# Altium PCB PCB-Powermodule-v7.0.3.PcbDoc (part 3 of 3)
Units mil, origin at the board's own origin, x right, y up, seen from the top; angles counter-clockwise.
Board outline 3937.01 x 1771.65 mil, 2 copper layers (Top Layer, Bottom Layer), stack 61.811 mil thick; 138 components, 96 nets, 573 pads, 259 vias.
Unrouted connection lines stored in the file: 20.
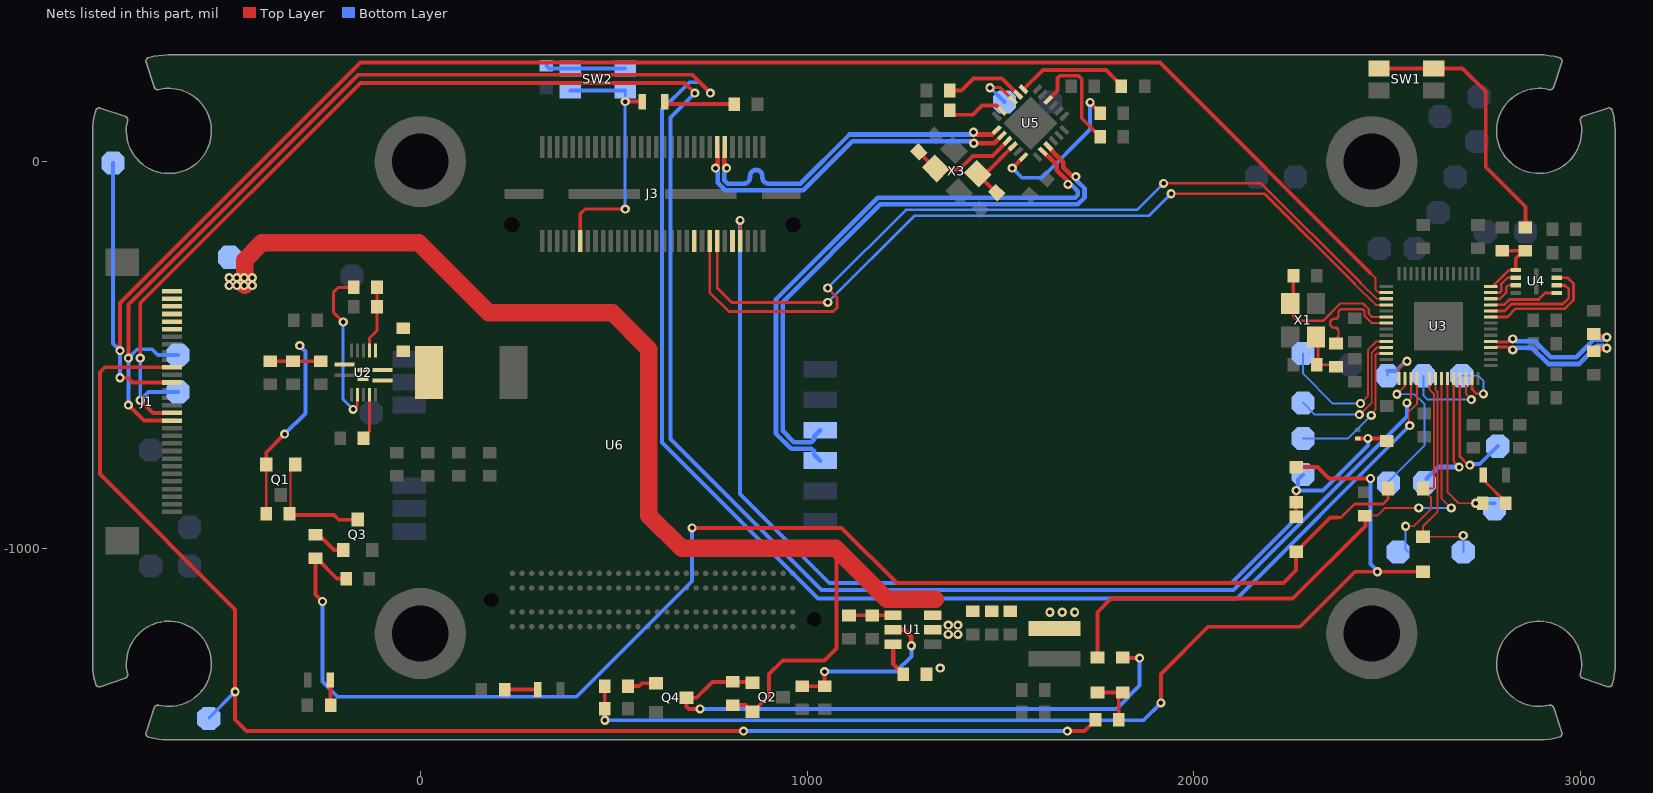
[diagram p2: the nets of this part, all layers, seen from the top]

## Via types
v1: diameter 23.62, hole 11.81, Top Layer to Bottom Layer, tented both sides, 257 vias
v2: diameter 23.62, hole 11.81, Top Layer to Bottom Layer, 2 vias

## Nets (pads, with @x,y where several pads share a name; then routed paths per layer and width w, separated by ;. In a path a pad name is that pad's centre, name@x,y a point inside that pad or via, vN(x,y) a via of type N, cw(c..) or ccw(c..) an arc to the next point about the centre after c; other vN are vias at no path point) (continued)
GPIO18: P37.1 U3.29 | length 127.9
  Top Layer w5: U3.29@2530.44,-560.96 2530.44,-534.56 2548.5,-516.5 v1(2551.46,-516.5)
  Bottom Layer w5: P37.1@2501,-554 P37.1@2501,-542
  Bottom Layer w10: P37.1@2501,-542 2522.27,-542 2547.77,-516.5 v1(2551.46,-516.5)
GPIO19: P38.1 U3.30 | length 370.1
  Top Layer w5: v1(2525.41,-601.79) 2546.19,-581.01 U3.30@2546.19,-560.96 U3.30@2545.33,-561.82
  Bottom Layer w5: P38.1@2503.8,-826.61 2596.8,-733.61 2596.8,-627.8 2570.79,-601.79 v1(2525.41,-601.79)
GPIO22: D6.2 P22.1 U3.34 | length 530.9
  Top Layer w5: v2(2547.8,-943.2) 2569.21,-943.2 2613.3,-899.11 2613.3,-867.8 2593.08,-847.58 D6.2@2593.08,-845.61 2617.87,-845.61 2620.8,-842.68 2620.8,-599.95 2609.18,-588.33 U3.34@2609.18,-560.96
  Bottom Layer w5: v2(2547.8,-943.2) 2547.8,-1002.8 P22.1@2555,-1010
GPIO23: D7.2 P21.1 U3.35 | length 575.1
  Top Layer w5: U3.35@2624.93,-560.96 2624.93,-589.93 2630.8,-595.8 2630.8,-905.2 2592.8,-943.2 D7.2@2592.8,-970.33 2692.67,-970.33 v2@2696,-967
  Bottom Layer w5: P21.1@2697,-1010 v2(2697,-967)
GPIO24: C18.2 D2.2 U3.36 | length 1506.3
  Top Layer w5: C18.2@2443.8,-915.61 2474.79,-915.61 2494.71,-895.69 v1(2581.8,-895.69) ; U3.36@2640.67,-560.96 2640.68,-591.54 2640.8,-591.66 2640.8,-871.8 v1@2666,-897
  Top Layer w10: D2.2@1751,-1282.68 1750.81,-1282.49 1750.81,-1165.61 1786.42,-1130 2256.01,-1130 2443.8,-942.21 C18.2@2443.8,-915.61
  Bottom Layer w5: v1(2581.8,-895.69) v1(2666,-895.69)
GPIO25: P39.1 R16.2 U3.37 | length 427.5
  Top Layer w5: U3.37@2656.42,-560.96 2656.42,-855.42 2684.61,-883.61 v1(2729,-883.61)
  Bottom Layer w10: v1(2729,-883.61) P39.1@2777.8,-883.61
GPIO26_ADC0: P16.1 U3.38 | length 330.2
  Top Layer w7: U3.38@2672.17,-560.96 2672.17,-776.17 v1(2686,-790)
  Bottom Layer w12: P16.1@2602.8,-819.61 2632.41,-790 v1(2686,-790)
GPIO27_ADC1: P17.1 U3.39 | length 329.6
  Top Layer w7: U3.39@2687.92,-560.96 2687.92,-763.2 2709.72,-785 v1(2714.18,-785)
  Bottom Layer w10: v1(2714.18,-785) 2716.79,-782.39 2739.61,-782.39 P17.1@2786,-736
GPIO28_ADC2: P18.1 U3.40 | length 239.1
  Top Layer w5: U3.40@2703.67,-560.96 2703.67,-601.02 2717.79,-615.14 v1(2717.79,-615.64)
  Bottom Layer w5: P18.1@2594,-554 2594,-604 2605.64,-615.64 v1(2717.79,-615.64)
GPIO29_ADC3: P19.1 U3.41 | length 157.5
  Top Layer w7: U3.41@2719.41,-560.96 2719.41,-588.55 2731.58,-600.71 2748.56,-600.71 v1(2748.84,-601)
  Bottom Layer w5: P19.1@2693,-554 2736,-554 2748.84,-566.84 v1(2748.84,-601)
HUB_RESET: P33.1 U5.15 | length 124.1
  Top Layer w8: v1(1473,191) 1500.11,191 U5.15@1532.01,159.1
  Bottom Layer w10: v1@1473.7,191 P33.1@1510.39,154.31
NetC1_1: C1.1 L1.1 U2.8 U2.9 U2.15 U2.16
NetC1_2: C1.2 U2.10
NetC2_2: C2.2 U2.6 | length 119.5
  Top Layer w7: C2.2@-147.2,-715.61 -147.2,-713.11 -135.7,-701.61 -135.56,-701.61 -131.45,-697.51 U2.6@-131.45,-602.68
NetC10_1: C10.1 L2.1 U1.2
  other v1: 1344.46,-1310.11 1364.98,-1222.61 1389.98,-1222.61 1364.98,-1198.61 1389.98,-1198.61 1628,-1165.61 1660,-1165.61 1692,-1165.61
NetC10_2: C10.2 U1.6 | length 88.4
  Top Layer w11.81: U1.6@1222.62,-1248.01 1222.62,-1299.43 C10.2@1248.8,-1325.61
NetC17_2: C17.2 R7.2 U2.11 | length 170.9
  Top Layer w7: U2.11@-131.44,-488.52 -131.44,-456.44
  Top Layer w8: -131.44,-456.44 -112.2,-437.2 C17.2@-112.2,-375.61 R7.2@-112.2,-325.61
NetC28_1: C28.1 R19.2 X1.3 | length 140.2
  Top Layer w7: X1.3@2321.26,-453.92 2321.26,-522.15 C28.1@2317.8,-525.61 2321.26,-525.61 R19.2@2352.8,-525.61 ; R19.2@2357.8,-530.61 R19.2@2352.8,-525.61 ; R19.2@2377.8,-525.61 R19.2@2352.8,-525.61
NetC34_2: C34.2 U5.22 X3.1 | length 168.1
  Top Layer w10: X3.1@1451.09,-42.47 C34.2@1489.01,-80.4 ; X3.1@1451.09,-41.57 1496,3.34 ; 1496,3.67 U5.22@1532.01,39.68
NetC35_1: C35.1 U5.21 X3.3 | length 264.3
  Top Layer w10: C35.1@1298.85,14.96 X3.3@1331.99,-18.18 ; X3.3@1332.51,-17.65 1335.3,-20.43 1393.62,-20.43 1428.67,14.62 1479.11,14.62 U5.21@1518.09,53.6
NetC38_2: C38.2 U5.10 | length 307.3
  Top Layer w10: U5.10@1622.54,158.05 U5.10@1623.59,159.1 1647.54,183.05 1647.54,216.03 1653.39,221.89 1701.94,221.89 1710.19,213.64 1710.19,112 1745.3,76.89 1747.8,76.89 1757.8,66.89 C38.2@1757.8,64.39
NetD2_1: D2.1 D3.1 R29.2 | length 144.3
  Top Layer w10: D2.1@1751,-1373.23 1807.09,-1373.23 1807.93,-1374.07 1817.99,-1373.23 D3.1@1816,-1373.23 1806,-1383.23 R29.2@1806,-1444
NetD3_2: D3.2 Q2.1 Q4.3 R11.1 | length 1527.4
  Top Layer w10: v1(723.33,-1415.41) 722.74,-1416 694.03,-1416 688.17,-1410.14 Q4.3@688.17,-1386.61 714.39,-1386.61 755.39,-1345.61 R11.1@807.8,-1345.61 ; R11.1@808.19,-1346 857.22,-1346 Q2.1@859.43,-1348.21 ; D3.2@1816,-1282.68 1817.32,-1284 v1(1860,-1284)
  Bottom Layer w10: v1(723.33,-1415.41) 1799.7,-1415.41 1860,-1355.12 v1(1860,-1284)
NetD4_1: D4.1 D6.1 R12.1 R14.1 | length 3666.7
  Top Layer w7: 2370.77,-920.61 2380.77,-920.61 2415.77,-885.61 2489.39,-885.61 2502.52,-872.48 D6.1@2502.52,-845.61
  Top Layer w10: v1(-253.09,-1137.78) -271.2,-1119.67 R12.1@-271.2,-1025.61 -268.7,-1025.61 -216.34,-1077.97 -192.84,-1077.97 R14.1@-192.2,-1078.61 ; v1(702.7,-947.24) 1089.5,-947.24 1232.26,-1090 2231.59,-1090 2264.8,-1056.79 D4.1@2264.8,-1008.89 2266.77,-1008.89 2277.52,-998.14 2277.52,-996.17 2353.08,-920.61 2370.77,-920.61
  Bottom Layer w10: v1(-253.09,-1137.78) -253.09,-1344.91 -214,-1384 404,-1384 702.7,-1085.3 v1(702.7,-947.24)
NetD5_1: D5.1 D7.1 R13.1 R15.1 | length 2866.8
  Top Layer w10: v1@476.8,-1444.78 R15.1@476.8,-1415.06 ; R13.1@476.8,-1356.61 R15.1@476.8,-1414.61 R15.1@477.25,-1415.06 ; v1(1915,-1400) 1915,-1325 2037,-1203 2274.52,-1203 2416.63,-1060.89 D7.1@2592.8,-1060.89 ; D5.1@2257.8,-790.33 2320.33,-790.33 2349.61,-819.61 v1(2456.99,-819.61)
  Bottom Layer w10: v1(477.25,-1444.78) 1870.22,-1444.78 v1(1915,-1400) ; v1(2456.99,-819.61) 2456.99,-1040.77 2474.79,-1058.58 v1(2474.79,-1060.89)
NetJ3_49: J3.49 LED4.2 SW2.1 | length 683.9
  Top Layer w5: LED4.2@572.66,155 LED4.2@573.27,154.39
  Top Layer w8: J3.49@413.39,-205.36 413.4,-135.36 425.65,-123.11 v1(529.67,-123.11)
  Top Layer w10: v1(529.67,155) LED4.2@572.66,155
  Bottom Layer w6: v1(529.67,155) SW2.1@529.67,183.86
  Bottom Layer w8: v1(529.67,-123.11) v1(529.67,155)
  Bottom Layer w10: SW2.1@387.93,183.86 SW2.1@529.67,183.86
NetLED1_1: LED1.1 R1.1 | length 85.5
  Top Layer w10: R1.1@217.8,-1365.61 LED1.1@303.27,-1365.61
NetLED2_1: LED2.1 R4.1 | length 65.2
  Top Layer w10: LED2.1@-232.67,-1340.61 -232.67,-1405.14 R4.1@-232.2,-1405.61
NetLED3_1: LED3.1 R16.1 | length 97.2
  Top Layer w7: LED3.1@2748.27,-810.61 2754.61,-816.95 2754.61,-828.92 2806.8,-881.11 R16.1@2806.8,-883.61
NetLED4_1: LED4.1 R23.1 | length 182.7
  Top Layer w10: LED4.1@632.33,154.39 632.33,153.23 637.17,148.39 R23.1@811.81,148.39
NetQ1_1: Q1.1 Q3.3 R9.1 | length 316.6
  Top Layer w6: R9.1@-338.6,-911 -336.02,-908.42 -336.02,-795.46 Q1.1@-323.8,-783.24
  Top Layer w10: R9.1@-338.6,-911 -335.17,-914.43 -222.88,-914.43 -211.07,-926.24 Q3.3@-162.2,-926.24
NetQ3_1: Q3.1 R12.2 | length 78.6
  Top Layer w10: R12.2@-262.2,-966.24 -223.46,-1004.98 Q3.1@-199.6,-1004.98
NetQ4_1: Q4.1 R13.2 | length 75.7
  Top Layer w10: R13.2@536.8,-1356.61 565.99,-1356.61 573.39,-1349.21 Q4.1@609.43,-1349.21
NetR3_1: R3.1 R6.1 U1.4 | length 114.5
  Top Layer w10: R3.1@1108.39,-1173.8 1108.98,-1173.21 U1.4@1222.62,-1173.21
NetR5_2: R5.2 R8.2 U1.5 | length 442.8
  Top Layer w10: R5.2@987.8,-1356.61 988.19,-1357 1045.8,-1357 1045,-1356.2 v1(1045,-1319)
  Top Layer w11.81: U1.5@1222.62,-1210.61 1251.3,-1210.61 1269.66,-1228.97 v1(1269.66,-1252.04)
  Bottom Layer w10: v1(1045,-1319) 1230.41,-1319 1269.66,-1279.74 v1(1269.66,-1252.04)
NetR7_1: R7.1 U2.4 | length 425
  Top Layer w7: v1(-173.81,-641) -172.42,-641 -162.95,-631.54 U2.4@-162.95,-602.68
  Top Layer w8: v1(-199.61,-415) -225.06,-389.55 -225.06,-338.25 -212.42,-325.61 R7.1@-172.2,-325.61
  Bottom Layer w8: v1@-199.61,-415.67 -199.61,-615.2 v1(-173.81,-641)
NetR22_1: R22.1 SW1.2 | length 695.1
  Top Layer w10: SW1.2@2478.93,240.94 SW1.2@2620.67,240.94 2695.06,240.94 2755,181 2755,-14 2857.8,-116.8 R22.1@2857.8,-170.61
NetR24_1: R24.1 SW2.2 | length 206.6
  Bottom Layer w10: R24.1@326,248 333.06,240.94 SW2.2@387.93,240.94 SW2.2@529.67,240.94
NetR25_1: R25.1 U5.24 | length 413.5
  Top Layer w10: v1(1530.75,-17.01) 1530.87,-17.01 1559.72,11.84 U5.24@1559.84,11.84 ; v1@1732,152.69 1757.8,126.89 R25.1@1757.8,124.39
  Bottom Layer w10: v1(1530.75,-17.01) 1555.51,-41.77 1607.64,-41.77 1732,82.59 v1(1732,153)
NetR26_2: R26.2 U5.13 | length 292.7
  Top Layer w10: U5.13@1559.84,186.94 1609.79,236.89 1772.8,236.89 1780.36,229.33 1812.8,196.89 R26.2@1812.8,194.39
NetR27_2: R27.2 U5.14 | length 207.5
  Top Layer w10: R27.2@1368.88,183.74 1398.91,183.74 1430.29,215.11 1503.84,215.11 U5.14@1545.92,173.02
NetR28_2: R28.2 U5.17 | length 158.5
  Top Layer w10: R28.2@1368.78,132.43 1368.78,130.88 1378.78,120.88 1427.6,120.88 1452.05,145.33 1489.37,145.33 1504.51,130.2 U5.17@1505.23,130.2
QSPI_SD0: U3.53 U4.5 | length 183.6
  Top Layer w7: U3.53@2768.15,-370.49 2802.18,-370.49 2816.15,-356.52 2891.83,-356.52 2908.21,-340.15 U4.5@2939.21,-340.15
QSPI_SD1: U3.55 U4.2 | length 91.4
  Top Layer w6: U3.55@2768.15,-339 2790.99,-339 2795.52,-334.47 2795.52,-316.26 2811.15,-300.63 U4.2@2832.94,-300.63
QSPI_SD2: U3.54 U4.3 | length 87.2
  Top Layer w6: U3.54@2768.15,-354.74 2792.03,-354.75 2807.72,-339.06 2807.72,-325.27 2812.53,-320.47 U4.3@2833.09,-320.47
QSPI_SD3: U3.51 U4.7 | length 323.4
  Top Layer w7: U3.51@2768.15,-401.99 2811.01,-401.99 2832.48,-380.52 2957.48,-380.52 2959.45,-380.52 2982,-357.97 2982,-356 2982,-318 2982,-315.49 2967.13,-300.62 U4.7@2939.36,-300.62
QSPI_SLCK: U3.52 U4.6 | length 273.4
  Top Layer w7: U3.52@2768.15,-386.24 2803.4,-386.24 2821.12,-368.52 2954.48,-368.52 2970,-353 2970,-330 2960.46,-320.46 U4.6@2939.21,-320.46
QSPI_SS: R21.1 R22.2 U3.56 U4.1 | length 194.6
  Top Layer w6: U3.56@2768.15,-323.25 2772.53,-323.25 2815.15,-280.63 U4.1@2832.62,-280.63
  Top Layer w10: R21.1@2797.8,-230.61 R22.2@2852.39,-230.61 ; U4.1@2832.62,-280.63 2832.62,-250.69 R22.2@2852.39,-230.92
RESET_MCU: J3.09
RESET_USB_HUB: J3.19
RUN: P26.1 U3.26 | length 391
  Top Layer w5: v1(2458.8,-656.39) 2458.8,-652.11 2470.31,-640.6 2470.31,-499.4 2473.24,-496.47 U3.26@2497.45,-496.48
  Bottom Layer w5: P26.1@2282.8,-716.54 2398.66,-716.54 v1(2458.8,-656.39)
SBUS_TX: J1.13 P29.1 U3.16 | length 4616
  Top Layer w5: 2456.5,-287.81 2469.45,-300.76 2469.45,-330.61 2477.83,-339 U3.16@2497.45,-339
  Top Layer w10: v1(-776.81,-559.08) -756.51,-559.08 -744.19,-571.4 J1.13@-648.22,-571.4 ; v1(-776.81,-488.75) -776.81,-365.52 -154.89,256.41 1912.28,256.41 2456.5,-287.81
  Bottom Layer w10: P29.1@-795.2,-3.61 -795.2,-470.36 v1(-776.81,-488.75) v1(-776.81,-559.08)
SCL0: J1.18 P28.1 U3.32 | length 5750.8
  Top Layer w5: v1(2558.66,-682.75) 2555.91,-680 2555.91,-647.49 2577.68,-625.71 U3.32@2577.68,-560.96
  Top Layer w10: v1(-755,-630) -715.18,-669.82 J1.18@-642.52,-669.8 ; v1(-755,-508.13) -755,-370.02 -160.35,224.64 702.36,224.64 v1(750,177)
  Bottom Layer w10: v1(-755,-630) v1(-755,-508.13) ; v1@-755,-505.85 v1(-755,-508.13) ; P28.1@-627.2,-500.61 -679.22,-500.61 -694.52,-485.32 -732.19,-485.32 v1(-755,-508.13) ; v1(750,177) 721.81,205.19 695.66,205.19 624.99,134.52 624.99,-726.38 1028.61,-1130 2111.42,-1130 2538.92,-702.49 v1(2558.66,-682.75)
SCL_VOXL: J3.13 U3.18 | length 2102.2
  Top Layer w5: 2416.54,-316.99 2470.05,-370.5 U3.18@2497.45,-370.49
  Top Layer w7: J3.13@767.72,-205.36 767.72,-326.82 805.22,-364.31 v1(1053.35,-364.31) ; v1(1941.4,-83.21) 2182.76,-83.21 2416.54,-316.99
  Bottom Layer w7: v1(1053.35,-364.31) 1277.52,-140.15 1884.46,-140.15 v1(1941.4,-83.21)
SDA0: J1.17 P27.1 U3.31 | length 5409.3
  Top Layer w5: v1(2551,-624) 2551,-622.73 2561.95,-611.78 U3.31@2561.93,-560.96
  Top Layer w10: v1(-724.3,-617.13) -691.29,-650.14 J1.17@-642.52,-650.12 ; v1(-724.3,-508.27) -724.3,-366.27 -154.42,203.6 683.45,203.6 v1(710.06,177)
  Bottom Layer w10: v1(-724.3,-508.27) v1(-724.3,-617.13) -702.78,-595.61 P27.1@-627.2,-595.61 ; v1(710.06,177) 646.8,113.74 646.8,-717.35 1037.64,-1108.19 2102.38,-1108.19 2551,-659.57 v1(2551,-624)
SDA_VOXL: J3.15 U3.17 | length 2227.8
  Top Layer w5: 2432.09,-314.11 2472.72,-354.74 U3.17@2497.45,-354.74
  Top Layer w7: J3.15@748.04,-205.36 748.04,-338.27 797.71,-387.94 1067.47,-387.94 1077.39,-378.02 1077.39,-351.04 v1(1053.35,-327) ; v1(1922.04,-56.32) 2174.3,-56.32 2432.09,-314.11
  Bottom Layer w7: v1(1053.35,-327) 1255.35,-125 1853.36,-125 v1(1922.04,-56.32)
SW1: J1.11 P3.1 R29.1 | length 3574.7
  Top Layer w10: J1.11@-648.22,-532.03 -816.03,-532.03 -829,-545 -829,-808 -479,-1158 v1(-479,-1371.2) -479,-1443.22 -449.41,-1472.81 v1(835.52,-1472.81) ; v1(1673,-1472.81) 1717.19,-1472.81 1733.5,-1456.5 1736,-1456.5 1746,-1446.5 R29.1@1746,-1444
  Bottom Layer w10: P3.1@-546,-1438.2 v1(-479,-1371.2) ; v1(835.52,-1472.81) v1(1673,-1472.81)
SWCLK: P24.1 U3.24 | length 435
  Top Layer w5: v1(2431.12,-625.71) 2450.31,-606.52 2450.31,-487.22 2472.56,-464.97 U3.24@2497.45,-464.98
  Bottom Layer w5: P24.1@2282.8,-496.61 2282.8,-548.5 2360.01,-625.71 v1(2431.12,-625.71)
SWDIO: P25.1 U3.25 | length 375.2
  Top Layer w5: v1(2428.37,-654.58) 2429.56,-654.58 2460.31,-623.83 2460.31,-494.23 2473.83,-480.72 U3.25@2497.45,-480.73
  Bottom Layer w5: P25.1@2282.8,-624.07 2313.31,-654.58 v1(2428.37,-654.58)
USB-WIFI_N: U5.2 U6.3 | length 1543.4
  Top Layer w12: U5.2@1609.68,25.76 1610.37,25.76 1623.82,12.3 1625.03,12.3 1645.93,-8.6 1645.93,-22.08 1674.75,-50.89 v1(1674.75,-59.11)
  Bottom Layer w12: U6.3@1033.84,-773.37 1018.19,-757.72 1018.19,-749.53 1011.16,-742.5 958.67,-742.5 919.63,-703.45 919.63,-356.29 1182.42,-93.5 1693.35,-93.5 1700.38,-86.47 1700.38,-76.53 1685.19,-61.34 1676.97,-61.34 v1(1674.75,-59.11)
USB-WIFI_P: U5.3 U6.4 | length 1529.3
  Top Layer w12: U5.3@1623.59,39.68 1623.59,38.99 1637.05,25.53 1637.05,24.32 1662.93,-1.56 1662.93,-15.04 1686.77,-38.87 v1(1694.99,-38.87)
  Bottom Layer w12: U6.4@1033.84,-694.63 1018.19,-710.28 1018.19,-718.47 1011.16,-725.5 965.72,-725.5 936.63,-696.41 936.63,-363.34 1189.46,-110.5 1700.39,-110.5 1717.38,-93.51 1717.38,-69.49 1697.21,-49.32 1697.21,-41.1 v1(1694.99,-38.87)
USB_D_N: R18.1 U3.46 | length 383
  Top Layer w8: U3.46@2768.15,-480.73 2781.32,-480.73 2782.69,-479.35 2812.96,-479.35 2820.77,-487.17 v1(2825,-487.17)
  Top Layer w12: R18.1@3034,-491 3039.97,-485.03 3065.78,-485.03 v1(3068,-482.81)
  Bottom Layer w12: v1(2825,-487.17) 2828.14,-487.17 2833.96,-481.35 2874.31,-481.35 2916.39,-523.43 2996.49,-523.43 3023.22,-496.71 3023.22,-495.83 3042.04,-477 3059.04,-477 3064.86,-482.81 v1(3068,-482.81)
USB_D_P: R20.1 U3.47 | length 383
  Top Layer w8: U3.47@2768.15,-464.98 2781.32,-464.98 2782.69,-466.35 2812.96,-466.35 2820.77,-458.54 v1(2825,-458.54)
  Top Layer w12: R20.1@3034,-446 3039.97,-451.97 3065.78,-451.97 v1(3068,-454.19)
  Bottom Layer w12: v1(2825,-458.54) 2828.14,-458.54 2833.96,-464.35 2881.35,-464.35 2923.43,-506.43 2989.45,-506.43 3006.22,-489.67 3006.22,-488.79 3035,-460 3059.04,-460 3064.86,-454.19 v1(3068,-454.19)
VBAT: C3.2 C4.2 C5.2 C6.2 C7.2 C8.2 J1.1 J1.2 J1.3 J1.4 J1.5 J1.6 P6.1 Q1.2 Q2.2 R9.2 R11.2 U1.3 U2.1 | length 3759.4
  Top Layer w6: R9.2@-398.6,-911 Q1.2@-398.6,-783.24
  Top Layer w10: Q1.2@-398.6,-780.64 -398.6,-752.6 v1(-351,-705) ; C6.2@-388,-516.4 -387.95,-516.45 C8.2@-257.76,-516.45 ; R11.2@807.8,-1405.61 840.46,-1405.61 846.32,-1411.47 846.32,-1411.87 857.46,-1423.01 Q2.2@859.43,-1423.01 901.43,-1381.01 901.43,-1325.57 937,-1290 1045,-1290 1076,-1259 1076,-1183.05 1075.89,-1182.94 1075.89,-1084.66 1076,-1084.55 1076,-991.54
  Top Layer w45: v1@-454.68,-320.49 -454.68,-254.67 -410.13,-210.13 -4.12,-210.13 176.57,-390.83 496.83,-390.83 591,-485 591,-915.56 675.44,-1000 1074,-1000 1206,-1132 1332.14,-1132
  Bottom Layer w10: v1(-351,-705) -297.1,-651.1 -297.1,-491 v1(-311.94,-476.16)
  other v1: -494.68,-320.49 -474.68,-320.49 -455.68,-320.49 -434.68,-320.49 -494.68,-300.49 -474.68,-300.49 -455.68,-300.49 -434.68,-300.49
VOXL_EN_BUCK: D1.1 D4.2 D5.2 J3.07 P20.1 R10.2 | length 2873.6
  Top Layer w7: v1(826.85,-152.11) v1(826.85,-152.11) J3.07@826.89,-205.36
  Top Layer w10: D4.2@2264.8,-918.33 D5.2@2264.8,-880.89 2264.85,-880.83 v1@2264.85,-850.71 ; R10.2@2423.84,-715.89 v1(2450.31,-715.89) D1.1@2492.8,-715.89
  Bottom Layer w10: v1(826.85,-152.11) 826.85,-859.53 1057.32,-1090 2097.96,-1090 2264.85,-923.11 v1(2264.85,-850.61) ; P20.1@2282.8,-809 2269.87,-821.93 2269.87,-841.9 2264.85,-846.92 v1(2264.85,-850.61) ; v1(2450.31,-715.89) 2450.31,-734.47 2334.17,-850.61 v1(2264.85,-850.61)
VOXL_USB_N: J3.12 U5.19 | length 892.8
  Top Layer w12: v1@786.07,-8.04 786.07,13.75 787.41,15.1 J3.12@787.41,37.64 ; v1(1430.44,75.8) 1433.59,75.8 1439.39,69.99 1478.81,69.99 U5.19@1490.25,81.43
  Bottom Layer w12: v1(791.88,-17) 791.88,-20.14 786.07,-25.96 786.07,-48 795.07,-57 804.1,-57 836.37,-57 ccw(c836.37,-41) 852.37,-41 852.37,-37.71 cw(c868.37,-37.71) 884.37,-37.71 884.37,-41 ccw(c900.37,-41) 900.37,-57 938.37,-57 982.83,-57 1109.77,69.95 1421.45,69.95 1427.3,75.8 v1(1430.44,75.8)
VOXL_USB_P: J3.14 U5.20 | length 885.4
  Top Layer w12: J3.14@767.72,37.64 767.72,15.1 769.07,13.75 v1@769.07,-8.04 ; v1(1431.05,47.18) 1483.84,47.18 U5.20@1498.8,62.15
  Bottom Layer w12: v1(763.25,-17) 763.25,-20.14 769.07,-25.96 769.07,-55.04 788.02,-74 938.37,-74 989.87,-74 1116.81,52.95 1422.15,52.95 1427.91,47.18 v1(1431.05,47.18)
XIN: C27.1 U3.20 X1.1 | length 417.8
  Top Layer w6: X1.1@2254.34,-372.51 2257.35,-375.52 2257.35,-400.35 2268.99,-411.99 2334.08,-411.99 2378.76,-367.3 2437.86,-367.3 2452.3,-381.74 2452.3,-393.49 2460.8,-401.99 U3.20@2497.45,-401.99
  Top Layer w7: X1.1@2256.45,-347.62 C27.1@2256.45,-295.62 ; X1.1@2257.8,-347.61 C27.1@2257.8,-295.61
XOUT: R19.1 U3.21 | length 267.9
  Top Layer w6: R19.1@2354.45,-472.62 2374.45,-452.62 2374.45,-438.73 ccw(c2365.2,-438.73) 2365.2,-429.48 2362.47,-429.48 cw(c2362.47,-420.23) 2353.22,-420.23 2353.22,-416.12 cw(c2362.47,-416.12) 2362.47,-406.87 2365.2,-406.87 ccw(c2365.2,-397.62) 2374.45,-397.62 2374.45,-387.17 2380.01,-381.61 2428.47,-381.61 2436.61,-381.61 2441.3,-386.3 2441.3,-394.44 2441.3,-398.87 2460.17,-417.74 U3.21@2497.45,-417.74
pads on no net: J1.8 J1.9 J1.MP1 J1.MP2 J2. J2.A05 J2.A06 J2.A08 J2.A09 J2.A10 J2.A11 J2.A12 J2.A14 J2.A16 J2.A17 J2.A18 J2.A19 J2.A20 J2.A21 J2.A23 J2.A25 J2.A26 J2.A28 J2.A29 J2.B07 J2.B08 J2.B09 J2.B10 J2.B11 J2.B12 J2.B13 J2.B14 J2.B16 J2.B17 J2.B18 J2.B19 J2.B20 J2.B21 J2.B23 J2.B24 J2.B25 J2.B26 J2.B28 J2.B29 J2.C05 J2.C06 J2.C07 J2.C08 J2.C09 J2.C10 J2.C12 J2.C13 J2.C14 J2.C15 J2.C16 J2.C18 J2.C19 J2.C20 J2.C21 J2.C22 J2.C24 J2.C28 J2.C29 J2.C30 J2.D05 J2.D06 J2.D07 J2.D08 J2.D09 J2.D10 J2.D11 J2.D13 J2.D14 J2.D16 J2.D17 J2.D19 J2.D20 J2.D22 J2.D23 J2.D25 J2.D26 J2.D29 J2.D30 J3. J3.02 J3.03 J3.04 J3.05 J3.06 J3.08 J3.16 J3.20 J3.22 J3.23 J3.24 J3.25 J3.26 J3.27 J3.28 J3.29 J3.30 J3.32 J3.33 J3.34 J3.35 J3.37 J3.38 J3.39 J3.40 J3.41 J3.42 J3.43 J3.45 J3.46 J3.47 J3.48 J3.50 J3.51 J3.52 J3.53 J3.54 J3.55 J3.56 J3.57 J3.60 U5.6 U5.7 U5.8 U5.11 U5.12 U5.23 U6.1 U6.6 U6.8 U6.11

## Polygon pours and split planes (outlines as drawn)
VBAT on Top Layer "Polygon_3_Net_+12V" (solid, remove dead copper, pour order 34): -405.5,-466 -405.5,-538.79 -168.29,-538.79 -168.29,-512.79 -180.05,-512.79 -183.29,-509.54 -183.29,-466
VBAT on Top Layer "VBAT_L01_P048" (solid, pour order 48): -373,-444.74 -351.74,-466 -329.19,-466 -329.19,-531.15 -336.83,-538.79 -454.68,-538.79 -454.68,-427.68 -585,-427.68 -596.81,-439.49 -668.11,-439.49 -668.11,-329.25 -622.14,-329.25 -474.89,-182 -373,-182
+5V on Top Layer "+5V_L01_P047" (solid, pour order 47): -614.91,-821.38 -603.09,-833.19 -516,-833.19 -516,-975.52 -612.48,-975.52 -668.11,-919.89 -668.11,-821.38
+5V on Top Layer "Polygon_3_Net_+5V" (solid, remove dead copper, pour order 46): 181.12,-776 271.12,-776 297.8,-802.68 297.8,-838.54 132.8,-1003.54 132.8,-1257.68 165.73,-1290.61 269.87,-1290.61 282.8,-1277.68 282.8,-1047.68 330.5,-999.98 427.8,-967.54 427.8,-708.54 384.87,-665.61 195.73,-665.61 172.8,-688.54 172.8,-767.68
GND on Top Layer "Polygon_1_Net_GND" (solid, remove dead copper, pour order 30): 2918.15,-372.62 2918.15,-673 3082.79,-673 3082.79,-372.62
+1V1 on Top Layer "Polygon_1_Net_+1V1" (solid, remove dead copper, pour order 28): 2898.65,-532 2851.09,-532 2807.19,-488.1 2763.65,-488.1 2763.65,-503.1 2795.12,-503.1 2838.65,-546.63 2838.65,-563.1 2858.65,-583.1 2898.65,-583.1
+5V on Top Layer "Polygon_3_Net_+5V" (solid, remove dead copper, pour order 24): 127,-999.98 127,-1290.61 282.8,-1290.61 282.8,-1047.68 282.8,-999.98
+1V1 on Top Layer "Polygon_3_Net_+1V1" (solid, remove dead copper, pour order 21): 2748.65,-463.11 2748.65,-498.11 2703.65,-498.11 2703.65,-361.64 2700.12,-358.11 2572.19,-358.11 2568.65,-361.64 2568.65,-463.11 2538.65,-463.11 2538.65,-438.11 2548.65,-438.11 2548.65,-354.57 2565.12,-338.11 2707.19,-338.11 2723.65,-354.57 2723.65,-463.11
+3V3 on Top Layer "Polygon_2_Net_+3V3" (solid, remove dead copper, pour order 20): 2898.65,-629.44 2898.65,-628.09 2898.65,-590 2860.56,-590 2778.65,-508.09 2693.65,-508.09 2693.65,-493.09 2563.65,-493.09 2563.65,-468.09 2533.65,-468.09 2533.65,-433.09 2543.65,-433.09 2543.65,-341.63 2552.19,-333.09 2710.12,-333.09 2728.65,-351.63 2728.65,-458.09 2768.65,-458.09 2768.65,-298.09 2508.65,-298.09 2508.65,-553.09 2730,-553.09 2730,-629.44
NetC1_1 on Top Layer "Polygon_1_Net_N$2" (solid, remove dead copper, pour order 12): -162,-518.65 -96.7,-518.65 -87.73,-509.68 -83.75,-505.7 -83.75,-480.7 -66.7,-463.65 -50.25,-463.65 121.19,-463.65 133.25,-475.7 133.25,-618.6 121.19,-630.65 -66.7,-630.65 -78.75,-618.6 -78.75,-598.6 -92.73,-584.63 -96.7,-580.65 -162,-580.65
GND on Top Layer "Polygon_4_Net_GND" (solid, remove dead copper, pour order 9): 273,-1250.61 1057.8,-1250.61 1057.8,-1039 273,-1039
+3V3 on Top Layer "Polygon_3_Net_+3V3" (solid, remove dead copper, pour order 5): 1709,-1256.98 1571.3,-1256.98 1571.3,-1303.8 1591.3,-1323.8 1591.3,-1488.5 1689,-1488.5 1689,-1323.5 1709,-1303.5
GND on Top Layer "Polygon_8_Net_GND" (solid, remove dead copper, pour order 45): 2049.3,-1495.6 2049.3,-1102.11 2791.35,-1102.11 2999.3,-894.16 2999.3,-592.11 3089.81,-592.11 3089.81,-1495.6
NetC10_1 on Top Layer "Polygon_4_Net_N$8" (solid, remove dead copper, pour order 0): 1373,-1351 1373,-1305 1367,-1299 1292,-1299 1292,-1357 1367,-1357
NetC10_1 on Top Layer "Polygon_1_Net_N$8" (solid, remove dead copper, pour order 1): 1402,-1238.11 1360.95,-1238.11 1350.95,-1228.11 1302,-1228.11 1302,-1193.11 1350.95,-1193.11 1360.95,-1183.11 1402,-1183.11
NetC10_1 on Top Layer "Polygon_5_Net_N$8" (solid, remove dead copper, pour order 3): 1566,-1130.15 1566,-1229.76 1709,-1229.76 1709,-1128 1698.76,-1117.76 1578.39,-1117.76
VBAT on Top Layer "Polygon_1_Net_+12V" (solid, remove dead copper, pour order 6): 1551,-1109.5 1303,-1109.5 1303,-1183.5 1341.62,-1183.5 1351.92,-1173.21 1405.71,-1173.21 1416,-1183.5 1551,-1183.5
VBAT on Top Layer "Polygon_1_Net_+12V" (solid, remove dead copper, pour order 7): 1556,-1307 1580,-1331 1580,-1455 1415,-1455 1415,-1277 1301,-1277 1301,-1233.11 1347.02,-1233.11 1357.02,-1243.11 1401.11,-1243.11 1436.22,-1208 1556,-1208
+5V on Top Layer "Polygon_1_Net_+5V" (solid, remove dead copper, pour order 11): 199,-775.57 199,-698 278,-698 278,-476 200,-476 200,-644.57 -85.96,-644.57 -109.2,-621.33 -109.2,-584.57 -120.2,-584.57 -120.2,-775.57
NetC1_2 on Top Layer "Polygon_1_Net_N$19" (solid, remove dead copper, pour order 14): -119.69,-460.08 -119.69,-507 -99.2,-507 -99.2,-454.89 -90.96,-446.64 -19.2,-446.64 -19.2,-397.4 -25.96,-390.64 -73.44,-390.64 -80.2,-397.4 -80.2,-412.6
+3V3 on Top Layer "Polygon_5_Net_+3V3" (solid, remove dead copper, pour order 39): -679.21,-721.61 -679.21,-705 -742,-705 -742,-787 -681,-787 -681,-775 -616.93,-775 -616.93,-721.61
+1V1 on Top Layer "Polygon_2_Net_+1V1" (solid, remove dead copper, pour order 27): 2892.96,-393 2892.96,-440 2831.73,-440 2809.23,-417.5 2833.73,-393
GND on Top Layer "GND_L01_P037" (solid, pour order 37): -827.53,-1357.78 cw(c-830.64,-1348.44) -840.13,-1351.05 cw(c-650.38,-1298.77) -847.2,-1298.76 -847.2,79.19 cw(c-650.34,79.21) -840.13,131.49 cw(c-830.64,128.87) -827.53,138.21 -763.66,116.94 cw(c-766.78,107.61) -757.22,105.27 ccw(c-650.35,79.19) -549.41,35.46 -545.98,44.43 ccw(c-650.34,79.19) -676.42,186.06 cw(c-678.76,195.63) -688.1,192.51 -709.37,256.37 cw(c-700.03,259.48) -702.64,268.97 cw(c-650.33,79.2) -652.14,276.04 2892.96,276.04 cw(c2892.96,79.21) 2945.67,268.85 cw(c2942.63,259.48) 2951.96,256.32 2930.7,192.49 cw(c2921.37,195.61) 2919.28,186 2918.49,186.19 ccw(c2892.95,79.19) 2858.19,-25.17 2867.42,-27.8 ccw(c2892.96,79.19) 2999.82,105.29 cw(c3009.38,107.6) 3006.27,116.94 3070.13,138.21 cw(c3073.25,128.87) 3082.79,131.29 cw(c2892.94,79.2) 3089.06,96.32 3089.81,79.19 3089.81,-1298.76 cw(c2892.96,-1298.74) 3082.5,-1351.89 3082.47,-1351.88 cw(c3073.24,-1348.44) 3070.13,-1357.78 3006.27,-1336.51 cw(c3009.39,-1327.17) 2999.82,-1324.83 ccw(c2892.96,-1298.75) 2792.02,-1255.03 2788.59,-1263.99 ccw(c2892.96,-1298.76) 2919.03,-1405.63 cw(c2921.37,-1415.19) 2930.71,-1412.07 2951.98,-1475.94 cw(c2942.64,-1479.05) 2946.82,-1487.96 2946.88,-1488.08 cw(c2892.95,-1298.76) 2892.96,-1495.61 -650.35,-1495.61 -652.14,-1495.6 cw(c-650.37,-1298.76) -702.64,-1488.54 cw(c-700.03,-1479.05) -709.37,-1475.94 -688.1,-1412.07 cw(c-678.76,-1415.19) -676.42,-1405.63 ccw(c-650.35,-1298.76) -545.98,-1263.99 -549.41,-1255.03 ccw(c-650.35,-1298.75) -757.22,-1324.83 cw(c-766.78,-1327.17) -763.66,-1336.51
GND on Top Layer "Polygon_5_Net_GND" (solid, remove dead copper, pour order 31): 197.87,113.89 197.87,-296.11 1007.87,-296.11 1007.87,113.89
GND on Top Layer "Polygon_17_Net_GND" (solid, remove dead copper, pour order 8): 1228.82,256.32 1228.82,52.64 1327.06,-45.6 1427.06,-145.6 1929.96,-145.6 1982.01,-93.55 1982.01,11.4 1832.8,11.4 1832.8,102.82 1832.8,256.32
+5V on Bottom Layer "+5V_L02_P025" (solid, pour order 25): 105,-677 168,-677 168,-993 266,-993 270,-993 270,-1005 270,-1275 137,-1275 105,-1275
NetC10_1 on Bottom Layer "Polygon_3_Net_N$8" (solid, remove dead copper, pour order 2): 1400.48,-1227.11 1400.48,-1342.06 1383.43,-1359.11 1345.53,-1359.11 1333.48,-1347.06 1333.48,-1304.16 1345.53,-1292.11 1365.53,-1292.11 1373.48,-1284.16 1373.48,-1227.11
NetC10_1 on Bottom Layer "Polygon_2_Net_N$8" (solid, remove dead copper, pour order 4): 1399.48,-1238.11 1354.48,-1238.11 1354.48,-1183.11 1398.02,-1183.11 1408.02,-1193.11 1525.95,-1193.11 1539.48,-1179.57 1539.48,-1144.57 1709,-1144.57 1709,-1198.11 1578.02,-1198.11 1553.02,-1223.11 1408.02,-1223.11 1399.48,-1231.65
+3V3 on Bottom Layer "Polygon_3_Net_+3V3" (solid, remove dead copper, pour order 42): 1572.3,-1282.18 1710,-1282.18 1710,-1329 1690,-1349 1690,-1395 1592.3,-1395 1592.3,-1348.7 1572.3,-1328.7
VBAT on Bottom Layer "Polygon_2_Net_+12V" (solid, remove dead copper, pour order 15): -523.2,-213.64 -523.2,-337.86 -393.57,-337.86 -393.57,-213.64
GND on Bottom Layer "GND_L02_P036" (solid, pour order 36): -827.53,-1357.78 cw(c-830.64,-1348.44) -840.13,-1351.05 cw(c-650.38,-1298.77) -847.2,-1298.76 -847.2,79.19 cw(c-650.34,79.21) -840.13,131.49 cw(c-830.64,128.87) -827.53,138.21 -763.66,116.94 cw(c-766.78,107.61) -757.22,105.27 ccw(c-650.35,79.19) -549.41,35.46 -545.98,44.43 ccw(c-650.34,79.19) -676.42,186.06 cw(c-678.76,195.63) -688.1,192.51 -709.37,256.37 cw(c-700.03,259.48) -702.64,268.97 cw(c-650.33,79.2) -652.14,276.04 2892.96,276.04 cw(c2892.96,79.21) 2945.67,268.85 cw(c2942.63,259.48) 2951.96,256.32 2930.7,192.49 cw(c2921.37,195.61) 2919.28,186 2918.49,186.19 ccw(c2892.95,79.19) 2858.19,-25.17 2867.42,-27.8 ccw(c2892.96,79.19) 2999.82,105.29 cw(c3009.38,107.6) 3006.27,116.94 3070.13,138.21 cw(c3073.25,128.87) 3082.79,131.29 cw(c2892.94,79.2) 3089.06,96.32 3089.81,79.19 3089.81,-1298.76 cw(c2892.96,-1298.74) 3082.5,-1351.89 3082.47,-1351.88 cw(c3073.24,-1348.44) 3070.13,-1357.78 3006.27,-1336.51 cw(c3009.39,-1327.17) 2999.82,-1324.83 ccw(c2892.96,-1298.75) 2792.02,-1255.03 2788.59,-1263.99 ccw(c2892.96,-1298.76) 2919.03,-1405.63 cw(c2921.37,-1415.19) 2930.71,-1412.07 2951.98,-1475.94 cw(c2942.64,-1479.05) 2946.82,-1487.96 2946.88,-1488.08 cw(c2892.95,-1298.76) 2892.96,-1495.61 -650.35,-1495.61 -652.14,-1495.6 cw(c-650.37,-1298.76) -702.64,-1488.54 cw(c-700.03,-1479.05) -709.37,-1475.94 -688.1,-1412.07 cw(c-678.76,-1415.19) -676.42,-1405.63 ccw(c-650.35,-1298.76) -545.98,-1263.99 -549.41,-1255.03 ccw(c-650.35,-1298.75) -757.22,-1324.83 cw(c-766.78,-1327.17) -763.66,-1336.51

## Keep-outs
Top Layer:
  region: 1305.04,-159.03 2210.56,-159.03 2210.56,-1063.74 1305.04,-1063.74

## Other copper
Top Layer:
  rectangle net GPIO17: 2480,-537 2515,-524
  rectangle net GPIO25: 2716,-903 2764,-864
Bottom Layer:
  rectangle net +5V: -627.2,-975.61 -567.2,-865.27
  rectangle net +3V3: -755,-791.98 -665,-699
  pour cut-out: 275,-1071 177,-1071 177,-393 983,-393 983,-1071
  pour cut-out: -178.11,-510.79 -178.11,-585.79 -108.11,-585.79 -108.11,-627 177,-627 177,-392 -19.33,-392 -108.11,-480.79 -108.11,-510.79

## Silkscreen, mask and mechanical layers (free items; w line width, h text height)
Top Overlay:
  drawing of 1866 lines, arcs and shapes, not listed
  text "POWER MODULE V.7.0.3" at -60,215 h77.48
  text "BOOT SELECT" at 2453.14,126.76 h32
Bottom Overlay:
  drawing of 1846 lines, arcs and shapes, not listed
  text "GPIO6" at 2864,213.72 h60
  text "GPIO5" at 2654,158.72 h60
  text "GND" at 1795,129 h60
  text "HUB_RESET" at 1468.41,127 h60
  text "FAST BOOT" at 557.57,119.2 h40
  text "GPIO4" at 2694,39 h42
  text "GPIO11" at 2138,2 h60 r270
  text "GPIO10" at 2238,2 h60 r270
  text "GPIO3" at 2875,-75.28 h60
  text "SBUS_TX" at -585,-99 h60
  text "RX1" at 2438,-246 h60
  text "12V" at -534,-269 h60
  text "ENLDO" at -218,-317 h60
  text "GPIO2" at 2622.72,-336 h60 r270
  text "TX1" at 2547,-364 h60 r270
  text "GPIO0" at 2734.72,-382 h60 r270
  text "GPIO1" at 2833,-386 h60 r270
  text "SWCLK" at 2257.97,-455.03 h60 r270
  text "GPIO16" at 2381,-485 h60 r270
  text "GPIO18" at 2476,-513 h60 r270
  text "SCL0" at -669,-525 h60
  text "SDA0" at -669,-620 h60
  text "SWDIO" at 2510.61,-646 h60
  text "CLK" at -172,-675 h60
  text "ADC1" at 2761,-695 h60 r270
  text "RUN" at 2442,-741.1 h60
  text "ADC2" at 2569,-749.61 h60 r270
  text "ADC3" at 2670,-750 h60 r270
  text "3V3" at -553.41,-771 h60
  text "5V" at -487,-968 h60
  text "GPIO19" at 2342,-978 h60 r270
  text "ADC0" at 2573,-1066.79 h60 r270
  text "GPIO23" at 2410,-1093 h60 r270
  text "GND" at -573.34,-1130 h60
  text "GPIO25" at 2753,-1138 h60 r270
  text "GPIO23" at 2673,-1251 h60 r270
  text "VOXL_EN_BUCK" at 2252.94,-1296 h60 r270
  text "SW1" at -391,-1466 h60
Dimensions:
  lines w6: 1117.8,-900.61 cw(c1142.8,-900.61) 1142.8,-875.61 ; 1117.8,-900.61 cw(c1142.8,-900.61) 1142.8,-875.61 ; 1117.8,-900.61 ccw(c1142.8,-900.61) 1142.8,-925.61 ; 1117.8,-900.61 ccw(c1142.8,-900.61) 1142.8,-925.61 ; 1117.8,-800.61 cw(c1142.8,-800.61) 1142.8,-775.61 ; 1117.8,-800.61 cw(c1142.8,-800.61) 1142.8,-775.61 ; 1117.8,-800.61 ccw(c1142.8,-800.61) 1142.8,-825.61 ; 1117.8,-800.61 ccw(c1142.8,-800.61) 1142.8,-825.61 ; 1117.8,-700.61 cw(c1142.8,-700.61) 1142.8,-675.61 ; 1117.8,-700.61 cw(c1142.8,-700.61) 1142.8,-675.61 ; 1117.8,-700.61 ccw(c1142.8,-700.61) 1142.8,-725.61 ; 1117.8,-700.61 ccw(c1142.8,-700.61) 1142.8,-725.61 ; 1142.8,-925.61 2142.8,-925.61 ; 1142.8,-925.61 2142.8,-925.61 ; 1142.8,-875.61 2142.8,-875.61 ; 1142.8,-875.61 2142.8,-875.61 ; 1142.8,-825.61 2142.8,-825.61 ; 1142.8,-825.61 2142.8,-825.61 ; 1142.8,-775.61 2142.8,-775.61 ; 1142.8,-775.61 2142.8,-775.61 ; 1142.8,-725.61 2142.8,-725.61 ; 1142.8,-725.61 2142.8,-725.61 ; 1142.8,-675.61 2142.8,-675.61 ; 1142.8,-675.61 2142.8,-675.61 ; 2142.8,-925.61 ccw(c2142.8,-900.61) 2167.8,-900.61 ; 2142.8,-925.61 ccw(c2142.8,-900.61) 2167.8,-900.61 ; 2142.8,-875.61 cw(c2142.8,-900.61) 2167.8,-900.61 ; 2142.8,-875.61 cw(c2142.8,-900.61) 2167.8,-900.61 ; 2142.8,-825.61 ccw(c2142.8,-800.61) 2167.8,-800.61 ; 2142.8,-825.61 ccw(c2142.8,-800.61) 2167.8,-800.61 ; 2142.8,-775.61 cw(c2142.8,-800.61) 2167.8,-800.61 ; 2142.8,-775.61 cw(c2142.8,-800.61) 2167.8,-800.61 ; 2142.8,-725.61 ccw(c2142.8,-700.61) 2167.8,-700.61 ; 2142.8,-725.61 ccw(c2142.8,-700.61) 2167.8,-700.61 ; 2142.8,-675.61 cw(c2142.8,-700.61) 2167.8,-700.61 ; 2142.8,-675.61 cw(c2142.8,-700.61) 2167.8,-700.61 ; 1347.8,-1000.61 cw(c1372.8,-1000.61) 1372.8,-975.61 2142.8,-975.61 cw(c2142.8,-1000.61) 2167.8,-1000.61 cw(c2142.8,-1000.61) 2142.8,-1025.61 1372.8,-1025.61 cw(c1372.8,-1000.61) 1347.8,-1000.61
  lines w19.68: 1305.04,-159.03 1305.04,-1062.55 2210.56,-1062.55 2210.56,-159.03 ; 1305.04,-157.93 2210.56,-157.93
Board_outline:
  lines w6: -847.2,-1298.76 ccw(c-650.38,-1298.77) -840.13,-1351.05 ccw(c-830.64,-1348.44) -827.53,-1357.78 -763.66,-1336.51 ccw(c-766.78,-1327.17) -757.22,-1324.83 cw(c-650.35,-1298.75) -549.41,-1255.03 -545.98,-1263.99 cw(c-650.35,-1298.76) -676.42,-1405.63 ccw(c-678.76,-1415.19) -688.1,-1412.07 -709.37,-1475.94 ccw(c-700.03,-1479.05) -702.64,-1488.54 ccw(c-650.37,-1298.76) -652.14,-1495.6 -650.35,-1495.61 2892.96,-1495.61 ccw(c2892.95,-1298.76) 2946.88,-1488.08 2946.82,-1487.96 ccw(c2942.64,-1479.05) 2951.98,-1475.94 2930.71,-1412.07 ccw(c2921.37,-1415.19) 2919.03,-1405.63 cw(c2892.96,-1298.76) 2788.59,-1263.99 2792.02,-1255.03 cw(c2892.96,-1298.75) 2999.82,-1324.83 ccw(c3009.39,-1327.17) 3006.27,-1336.51 3070.13,-1357.78 ccw(c3073.24,-1348.44) 3082.47,-1351.88 3082.5,-1351.89 ccw(c2892.96,-1298.74) 3089.81,-1298.76 3089.81,79.19 3089.06,96.32 ccw(c2892.92,79.2) 3082.79,131.29 ccw(c3073.25,128.87) 3070.13,138.21 3006.27,116.94 ccw(c3009.38,107.61) 2999.82,105.29 cw(c2892.96,79.19) 2867.42,-27.8 2858.19,-25.17 cw(c2892.95,79.19) 2918.49,186.19 2919.28,186 ccw(c2921.37,195.61) 2930.7,192.49 2951.96,256.32 ccw(c2942.63,259.48) 2945.67,268.85 ccw(c2892.96,79.2) 2892.96,276.04 -650.35,276.04 -652.14,276.04 ccw(c-650.33,79.2) -702.64,268.97 ccw(c-700.03,259.48) -709.37,256.37 -688.1,192.51 ccw(c-678.76,195.63) -676.42,186.06 cw(c-650.34,79.19) -545.98,44.43 -549.41,35.46 cw(c-650.35,79.19) -757.22,105.27 ccw(c-766.78,107.61) -763.66,116.94 -827.53,138.21 ccw(c-830.64,128.87) -840.13,131.49 ccw(c-650.34,79.21) -847.2,79.19 -847.2,-1298.76
  lines w10: 1305.04,-866.89 ccw(c1501.89,-866.89) 1501.89,-1063.74 2013.71,-1063.74 ccw(c2013.71,-866.89) 2210.56,-866.89 2210.56,-354.78 ccw(c2013.71,-354.78) 2013.71,-157.93 1501.89,-157.93 ccw(c1501.89,-354.78) 1305.04,-354.78 1305.04,-866.89
Fabrication:
  drawing of 191 lines, arcs and shapes, not listed
  text "Layer" at 3649.48,-665 h60
  text "Name" at 4059.39,-665 h60
  text "Material" at 4989.13,-665 h60
  text "Thickness" at 5848.9,-665 h60
  text "Constant" at 6498.74,-665 h60
  text "Board Layer Stack" at 7068.6,-665 h60
  text "Top Overlay" at 4059.39,-785 h60
  text "Top Solder" at 4059.39,-905 h60
  text "Solder Resist" at 4989.13,-905 h60
  text "0.39mil" at 5848.9,-905 h60
  text "3.5" at 6498.74,-905 h60
  text "1" at 3649.48,-1025 h60
  text "Top Layer" at 4059.39,-1025 h60
  text "1.38mil" at 5848.9,-1025 h60
  text "Dielectric 1" at 4059.39,-1145 h60
  text "FR-4" at 4989.13,-1145 h60
  text "59.06mil" at 5848.9,-1145 h60
  text "4.8" at 6498.74,-1145 h60
  text "2" at 3649.48,-1265 h60
  text "Bottom Layer" at 4059.39,-1265 h60
  text "1.38mil" at 5848.9,-1265 h60
  text "Bottom Solder" at 4059.39,-1385 h60
  text "Solder Resist" at 4989.13,-1385 h60
  text "0.39mil" at 5848.9,-1385 h60
  text "3.5" at 6498.74,-1385 h60
  text "Bottom Overlay" at 4059.39,-1505 h60
  text "Total board thickness:" at 3649.48,-1625 h60
  text "62.60mil" at 5848.9,-1625 h60
Top Glue Points:
  region: 1346.84,116.83 1346.84,148.33 1331.1,148.33 1331.1,116.83
  region: 1346.84,167.98 1346.84,199.48 1331.1,199.48 1331.1,167.98
  rectangle: 2352.05,-508.61 2383.55,-492.87
  region: 2418,-702 2418,-708.78 2429.84,-708.78 2429.84,-702
  rectangle: 310.25,210 341.75,225.74
  region: 833.81,164.14 833.81,132.64 849.55,132.64 849.55,164.14
  region: 1780.47,140.28 1780.47,108.78 1796.21,108.78 1796.21,140.28
  region: 1835.47,210.28 1835.47,178.78 1851.21,178.78 1851.21,210.28
  region: -150.2,-309.86 -150.2,-341.36 -134.46,-341.36 -134.46,-309.86
  region: -305.2,-394.86 -305.2,-426.36 -289.46,-426.36 -289.46,-394.86
  region: -376.6,-895.25 -376.6,-926.75 -360.86,-926.75 -360.86,-895.25
  rectangle: -286.95,-1003.61 -255.45,-987.87
  region: -170.2,-1062.86 -170.2,-1094.36 -154.46,-1094.36 -154.46,-1062.86
  region: -270.2,-1389.86 -270.2,-1421.36 -254.46,-1421.36 -254.46,-1389.86
  region: 179.8,-1349.86 179.8,-1381.36 195.54,-1381.36 195.54,-1349.86
  region: 499,-1399.06 499,-1430.56 514.74,-1430.56 514.74,-1399.06
  region: 498.8,-1340.86 498.8,-1372.36 514.54,-1372.36 514.54,-1340.86
  region: 823.55,-1367.61 792.05,-1367.61 792.05,-1383.35 823.55,-1383.35
  region: 1003.55,-1378.61 972.05,-1378.61 972.05,-1394.35 1003.55,-1394.35
  region: 1060.75,-1377 1029.25,-1377 1029.25,-1392.74 1060.75,-1392.74
  rectangle: 1087.64,-1141.8 1119.14,-1126.06
  rectangle: 1147.64,-1141.8 1179.14,-1126.06
  region: 2784.8,-899.36 2784.8,-867.86 2769.06,-867.86 2769.06,-899.36
  rectangle: 2767.05,-718.61 2798.55,-702.87
  rectangle: 3018.25,-529 3049.75,-513.26
  rectangle: 3018.25,-424 3049.75,-408.26
  region: 1313.03,32.47 1324.16,43.6 1307.46,60.3 1296.33,49.17
  region: 1470.24,-115.32 1481.37,-104.19 1464.66,-87.49 1453.53,-98.62
  region: 1600.54,-78.99 1611.67,-67.86 1594.97,-51.15 1583.84,-62.28
  region: 1721.34,206.15 1705.6,206.15 1705.6,182.53 1721.34,182.53
  region: 1796.34,77.15 1780.6,77.15 1780.6,53.53 1796.34,53.53
  region: -134.33,-363.99 -150.07,-363.99 -150.07,-387.61 -134.33,-387.61
  region: -32.58,-468.48 -32.58,-452.74 -56.2,-452.74 -56.2,-468.48
  region: -376.38,-554.27 -376.38,-538.53 -400,-538.53 -400,-554.27
  region: -317.82,-554.27 -317.82,-538.53 -341.44,-538.53 -341.44,-554.27
  region: -246.09,-554.27 -246.09,-538.53 -269.71,-538.53 -269.71,-554.27
  region: -169.33,-703.99 -185.07,-703.99 -185.07,-727.61 -169.33,-727.61
  region: -49.58,-790.48 -49.58,-774.74 -73.2,-774.74 -73.2,-790.48
  region: 30.42,-790.48 30.42,-774.74 6.8,-774.74 6.8,-790.48
  region: 110.42,-790.48 110.42,-774.74 86.8,-774.74 86.8,-790.48
  region: 190.42,-790.48 190.42,-774.74 166.8,-774.74 166.8,-790.48
  rectangle: 1265.93,-1267.23 1281.67,-1243.61
  region: 1532.62,-1130.87 1532.62,-1115.13 1509,-1115.13 1509,-1130.87
  region: 1484.62,-1130.87 1484.62,-1115.13 1461,-1115.13 1461,-1130.87
  region: 1434.62,-1130.87 1434.62,-1115.13 1411,-1115.13 1411,-1130.87
  rectangle: 1571.93,-1298.23 1587.67,-1274.61
  rectangle: 1571.93,-1370.62 1587.67,-1347
  region: 2453.42,-893.48 2453.42,-877.74 2429.8,-877.74 2429.8,-893.48
  rectangle: 2280.93,-307.23 2296.67,-283.61
  rectangle: 2280.93,-537.23 2296.67,-513.61
  region: 2405.18,-427.74 2405.18,-443.48 2428.8,-443.48 2428.8,-427.74
  region: 2405.18,-531.74 2405.18,-547.48 2428.8,-547.48 2428.8,-531.74
  region: 2584.18,-673.74 2584.18,-689.48 2607.8,-689.48 2607.8,-673.74
  region: 2711.18,-702.74 2711.18,-718.48 2734.8,-718.48 2734.8,-702.74
  region: 2831.18,-702.74 2831.18,-718.48 2854.8,-718.48 2854.8,-702.74
  rectangle: 2901.93,-620.23 2917.67,-596.61
  rectangle: 2899.93,-562.23 2915.67,-538.61
  rectangle: 2899.93,-482.23 2915.67,-458.61
  rectangle: 2899.93,-422.23 2915.67,-398.61
  region: 2582.38,-186.13 2582.38,-201.87 2606,-201.87 2606,-186.13
  region: 2723.38,-186.13 2723.38,-201.87 2747,-201.87 2747,-186.13
  rectangle: 2782.05,-208.61 2813.55,-192.87
  rectangle: 2842.05,-208.61 2873.55,-192.87
  rectangle: 2949.93,-247.23 2965.67,-223.61
  rectangle: 2949.93,-187.23 2965.67,-163.61
Drill Drawing:
  circle w10: c3674.62,226.83 r33.33
  lines w10: 3641.29,-89.83 3657.96,-89.83 3657.96,-106.5 3691.29,-106.5 3691.29,-89.83 3707.96,-89.83 3707.96,-56.5 3691.29,-56.5 3691.29,-39.83 3657.96,-39.83 3657.96,-56.5 3641.29,-56.5 3641.29,-89.83 ; 3641.29,110.17 3707.96,110.17 3674.62,43.5 3641.29,110.17 ; 3641.29,343.5 3707.96,343.5 3707.96,410.17 3641.29,410.17 3641.29,343.5
  lines w15: 3581.5,-151.5 10651.58,-151.5 ; 3581.5,448.5 10651.58,448.5 ; 4132.38,-301.5 4132.38,598.5 ; 4732.22,-301.5 4732.22,598.5 ; 5881.88,-301.5 5881.88,598.5 ; 6387.76,-301.5 6387.76,598.5 ; 7121.56,-301.5 7121.56,598.5 ; 8621.11,-301.5 8621.11,598.5 ; 9210.96,-301.5 9210.96,598.5 ; 9956.76,-301.5 9956.76,598.5 ; 3581.5,-301.5 10651.58,-301.5 10651.58,598.5 3581.5,598.5 3581.5,-301.5
  text "Symbol" at 3671.5,493.5 h72
  text "Count" at 4177.38,493.5 h72
  text "Hole Size" at 4777.22,493.5 h72
  text "Plated" at 5926.88,493.5 h72
  text "Hole Type" at 6432.76,493.5 h72
  text "Drill Layer Pair" at 7166.56,493.5 h72
  text "Via/Pad" at 8666.11,493.5 h72
  text "Pad Shape" at 9255.96,493.5 h72
  text "Template" at 10001.76,493.5 h72
  text "2" at 4177.38,343.5 h60
  text "37.40mil (0.950mm)" at 4777.22,343.5 h60
  text "NPTH" at 5926.88,343.5 h60
  text "Round" at 6432.76,343.5 h60
  text "Top Layer - Bottom Layer" at 7166.56,343.5 h60
  text "Pad" at 8666.11,343.5 h60
  text "Rounded" at 9255.96,343.5 h60
  text "c0hn95" at 10001.76,343.5 h60
  text "2" at 4177.38,193.5 h60
  text "40.16mil (1.020mm)" at 4777.22,193.5 h60
  text "NPTH" at 5926.88,193.5 h60
  text "Round" at 6432.76,193.5 h60
  text "Top Layer - Bottom Layer" at 7166.56,193.5 h60
  text "Pad" at 8666.11,193.5 h60
  text "Rounded" at 9255.96,193.5 h60
  text "c0hn102" at 10001.76,193.5 h60
  text "4" at 4177.38,43.5 h60
  text "145.67mil (3.700mm)" at 4777.22,43.5 h60
  text "PTH" at 5926.88,43.5 h60
  text "Round" at 6432.76,43.5 h60
  text "Top Layer - Bottom Layer" at 7166.56,43.5 h60
  text "Pad" at 8666.11,43.5 h60
  text "Rounded" at 9255.96,43.5 h60
  text "c600h370" at 10001.76,43.5 h60
  text "259" at 4177.38,-106.5 h60
  text "11.81mil (0.300mm)" at 4777.22,-106.5 h60
  text "PTH" at 5926.88,-106.5 h60
  text "Round" at 6432.76,-106.5 h60
  text "Top Layer - Bottom Layer" at 7166.56,-106.5 h60
  text "Via" at 8666.11,-106.5 h60
  text "Rounded" at 9255.96,-106.5 h60
  text "(Mixed)" at 10001.76,-106.5 h60
  text "267 Total" at 4177.38,-256.5 h60

## Dimensions
2892.96,276.04 to 2013.71,-157.93 on Dimensions
1501.89,-157.93 to 1501.89,-1063.74 on Dimensions
2013.71,-1063.74 to 2892.96,-1495.61 on Dimensions
1305.04,-354.78 to 2210.56,-354.78 on Dimensions
2167.8,-700.61 to 1117.8,-700.61 on Dimensions
3080.21,135.83 to 3082.47,-1351.88 on Dimensions
-706.99,266.44 to 2949.6,266.45 on Dimensions

## Text inside footprints (layer, text, board x,y; h text height)
J1: Top Overlay "1" at -713.5,-329.59 h30 r270
J2: Top Overlay "A1" at 177.47,-1212.78 h45
J3: Top Overlay "2" at 890.4,-1.86 h19.68 r180; Top Overlay "1" at 890.4,-146.86 h19.68 r180; Top Overlay "59" at 319.53,-146.86 h19.68 r180; Top Overlay "60" at 319.53,-1.86 h19.68 r180
SW1: Top Overlay "PCB EDGE" at 2557.25,172.23 h20 r90
SW2: Bottom Overlay "PCB EDGE" at 453.02,172.4 h20 r270
U6: Bottom Overlay "12" at 72.84,-968.73 h27.56; Bottom Overlay "9" at 46.84,-645.96 h27.56; Bottom Overlay "7" at 46.84,-527.85 h27.56; Bottom Overlay "6" at 966.84,-554.15 h27.56; Bottom Overlay "1" at 962.84,-947.85 h27.56